# Altium PCB PCB1.PcbDoc
Units mil, origin at the board's own origin, x right, y up, seen from the top; angles counter-clockwise.
Board outline 1968.5 x 1968.5 mil, 4 copper layers (Top Layer, Layer 2, Layer 3, Bottom Layer), stack 23.756 mil thick; 70 components, 47 nets, 261 pads, 125 vias.
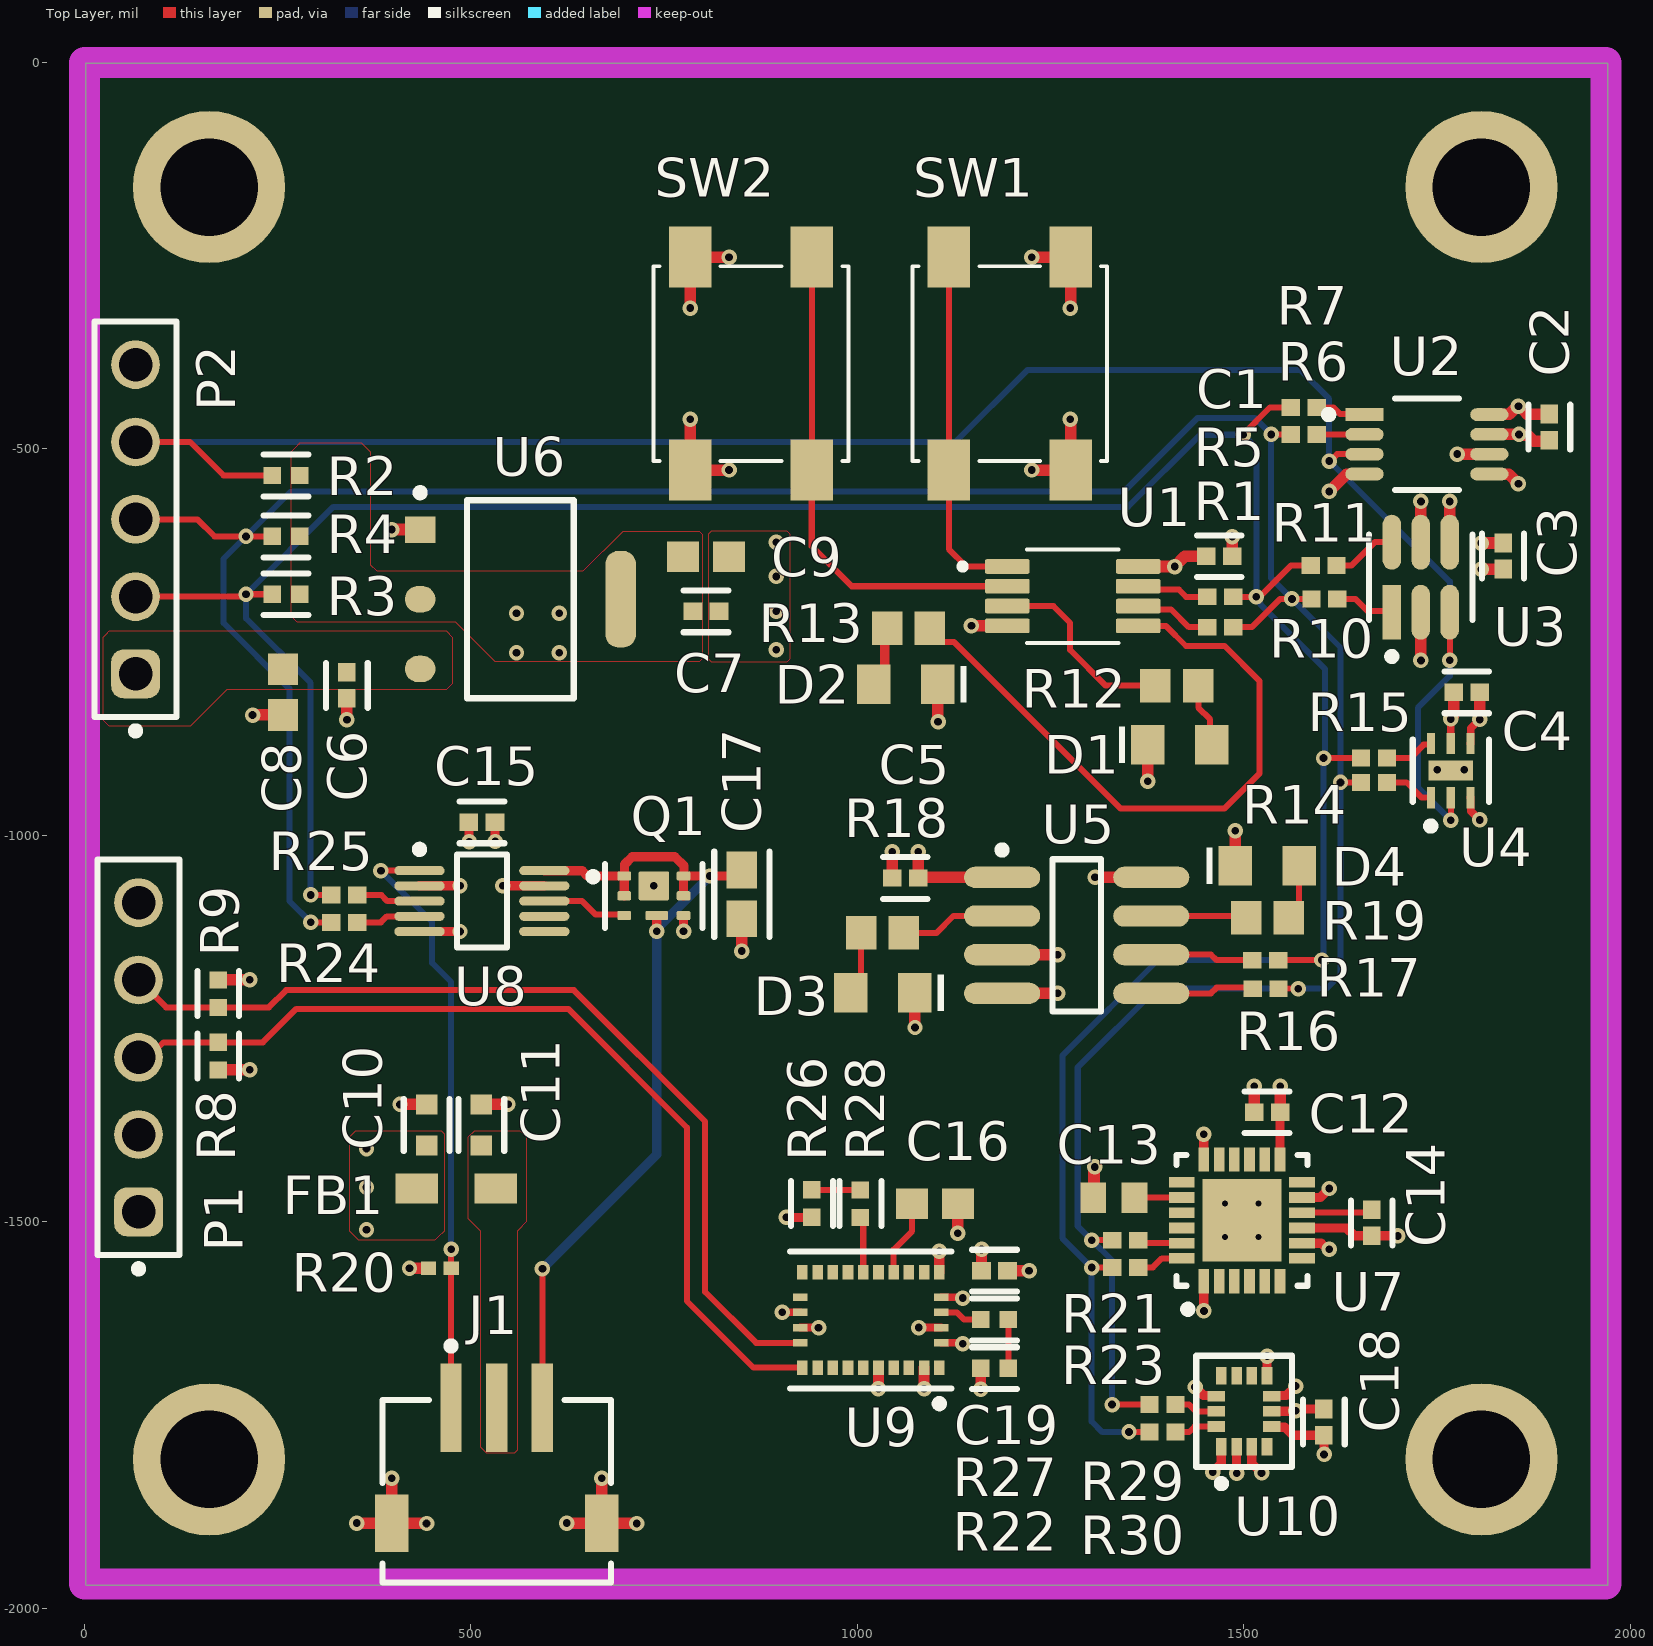
[diagram p0: Top Layer view]
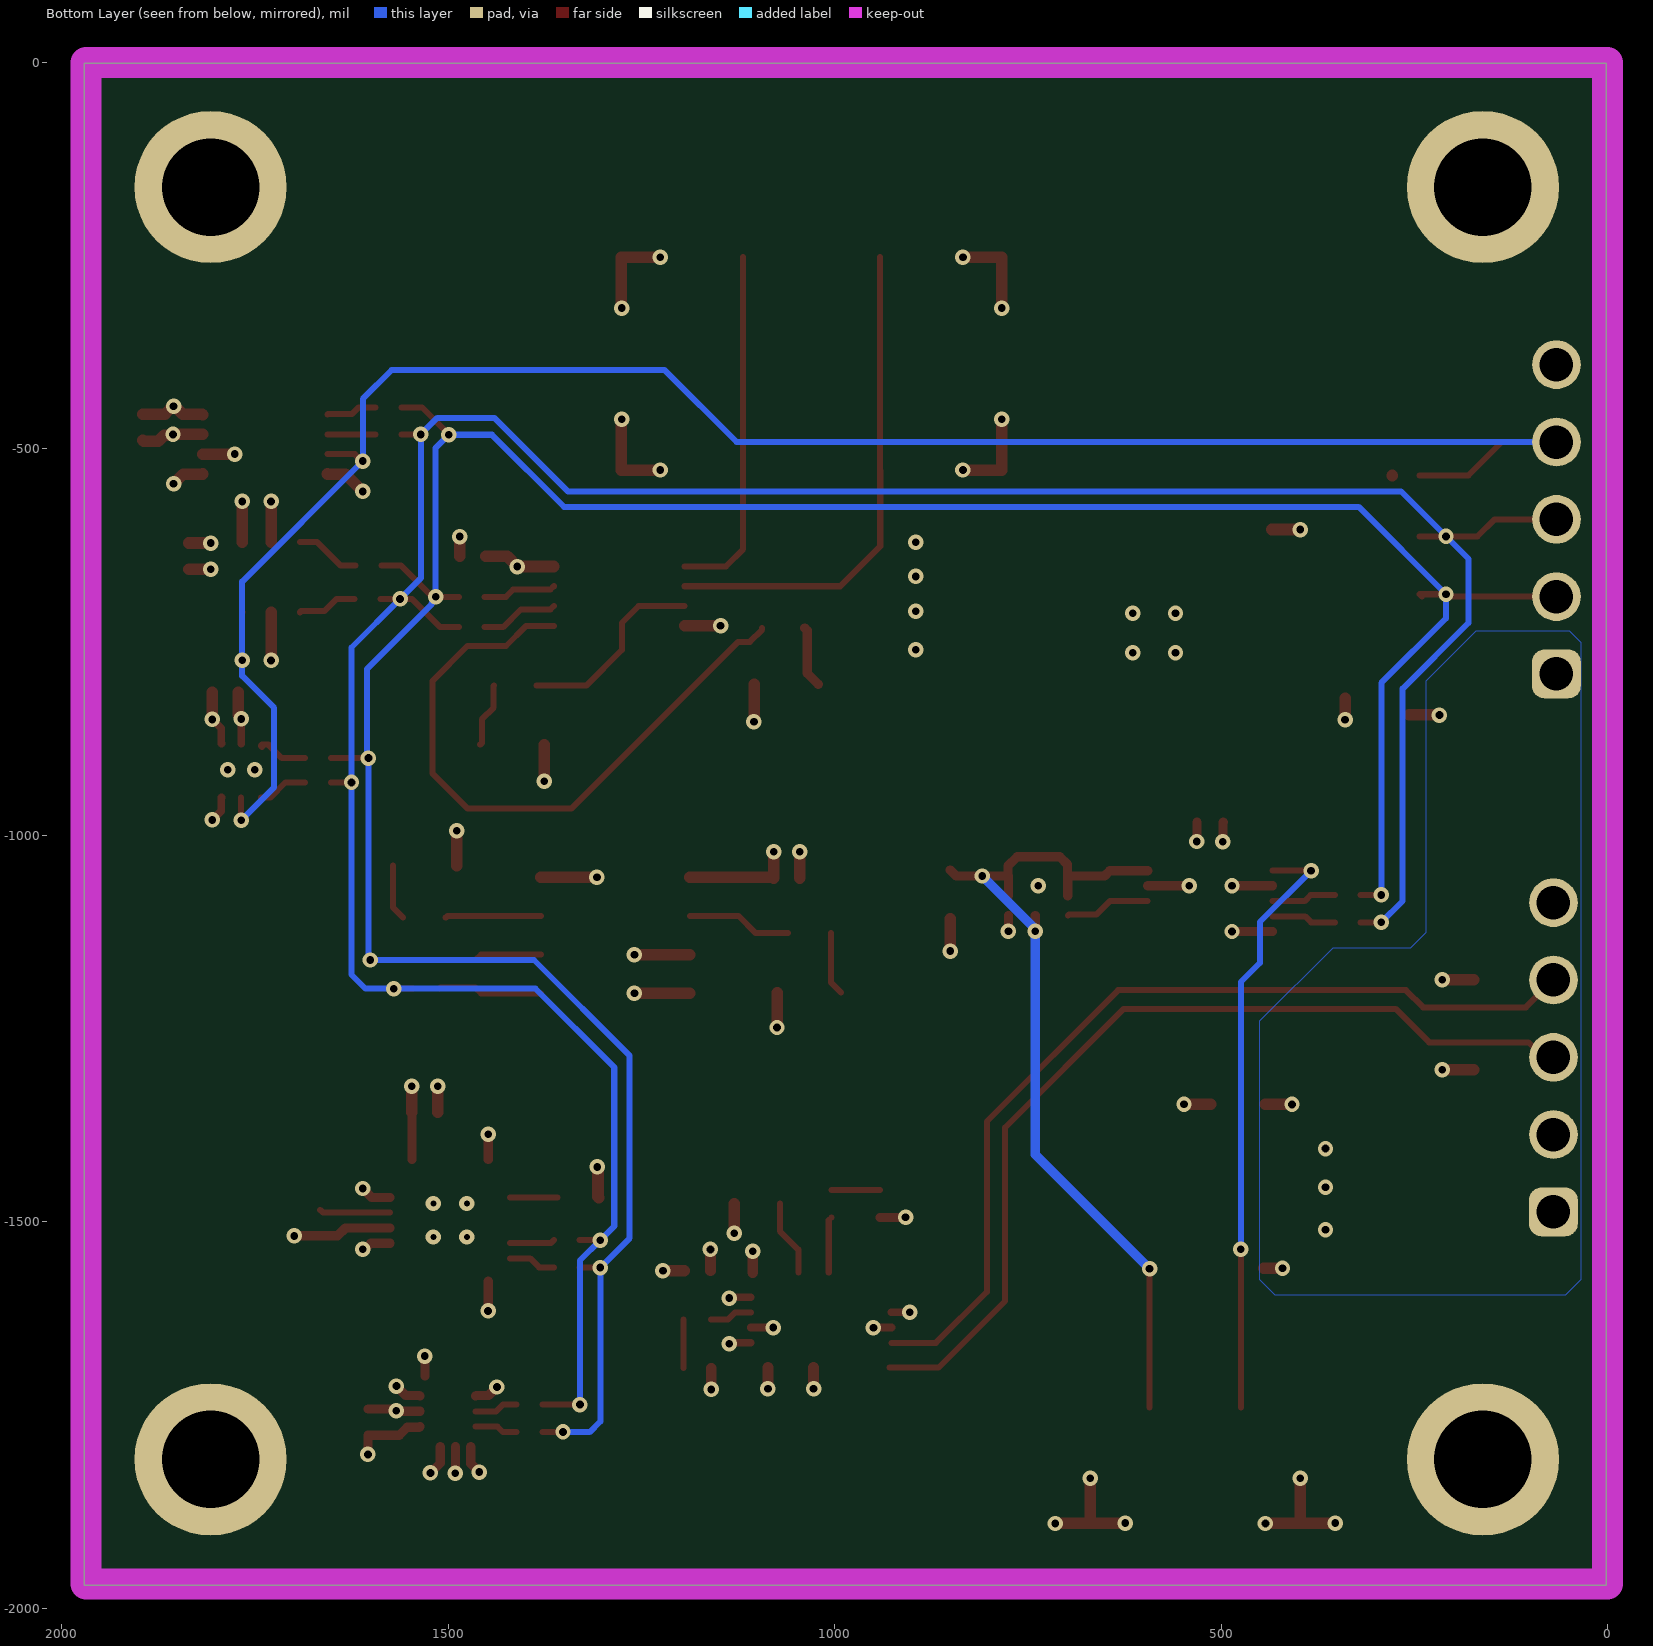
[diagram p1: Bottom Layer view, seen from below]

## Layer stack, top to bottom
Top Solder: solder mask 0.4, Solder Resist, Dk 3.5
Top Layer: signal copper 1.4
Dielectric 2: prepreg 2.8, PP-006, Dk 4.1
Layer 2: signal copper 1.378
Dielectric 1: dielectric 12.6, FR-4, Dk 4.8
Layer 3: signal copper 1.378
Dielectric 3: prepreg 2.8, PP-006, Dk 4.1
Bottom Layer: signal copper 1.4
Bottom Solder: solder mask 0.4, Solder Resist, Dk 3.5

## Board outline
1.97,-1969.61 1970.47,-1969.61 1970.47,-1.1 1.97,-1.1

## Design rules (kind name [scope] priority, off if disabled: settings)
AssemblyTestPointUsage [All] p0: scope1count=1 scope1_0_kind=Board scope1_0_value=Board scope2count=1 scope2_0_kind=Board scope2_0_value=Board commentlength=0
AssemblyTestpoint [All] p0: scope1count=1 scope1_0_kind=Board scope1_0_value=Board scope2count=1 scope2_0_kind=Board scope2_0_value=Board commentlength=0
Clearance [All] p0: scope1count=1 scope1_0_kind=Board scope1_0_value=Board scope2count=1 scope2_0_kind=Board scope2_0_value=Board commentlength=0 gap=8
Clearance [All] p1: gap=8 ignorepadtopadclearanceinfootprint=FALSE except(5: Arc-Arc Arc-Track Arc-SMDPad Track-Track Track-SMDPad SMDPad-SMDPad; 6: Arc-Via Track-Via)
ComponentClearance [All] p0: scope1count=1 scope1_0_kind=Board scope1_0_value=Board scope2count=1 scope2_0_kind=Board scope2_0_value=Board commentlength=0 gap=10 collisioncheckmode=3
DiffPairsRouting [All] p0: scope1count=1 scope1_0_kind=Board scope1_0_value=Board scope2count=1 scope2_0_kind=Board scope2_0_value=Board commentlength=0
FabricationTestPointUsage [All] p0: scope1count=1 scope1_0_kind=Board scope1_0_value=Board scope2count=1 scope2_0_kind=Board scope2_0_value=Board commentlength=0 valid=0 allowmultiple=FALSE
FabricationTestpoint [All] p0: scope1count=1 scope1_0_kind=Board scope1_0_value=Board scope2count=1 scope2_0_kind=Board scope2_0_value=Board commentlength=0 side=3 testpointundercomponent=TRUE minsize=40 maxsize=100 preferedsize=60 minholesize=0 maxholesize=40 preferedholesize=32 testpointgrid=1
FanoutControl Fanout_BGA [All] p0 off: scope1count=1 scope1_0_kind=Board scope1_0_value=Board scope2count=1 scope2_0_kind=Board scope2_0_value=Board commentlength=69 // Protel DXP Scope 1 Expression Was: IsBGA   Fanout_BGA (Default Rule)
FanoutControl Fanout_LCC [All] p0 off: scope1count=1 scope1_0_kind=Board scope1_0_value=Board scope2count=1 scope2_0_kind=Board scope2_0_value=Board commentlength=69 // Protel DXP Scope 1 Expression Was: IsLCC   Fanout_LCC (Default Rule)
FanoutControl Fanout_SOIC [All] p0 off: scope1count=1 scope1_0_kind=Board scope1_0_value=Board scope2count=1 scope2_0_kind=Board scope2_0_value=Board commentlength=71 // Protel DXP Scope 1 Expression Was: IsSOIC   Fanout_SOIC (Default Rule)
FanoutControl Fanout_Small [All] p0 off: scope1count=1 scope1_0_kind=Board scope1_0_value=Board scope2count=1 scope2_0_kind=Board scope2_0_value=Board commentlength=84 // Protel DXP Scope 1 Expression Was: (CompPinCount < 5)   Fanout_Small (Default Rule)
FanoutControl Fanout_Default [All] p0: scope1count=1 scope1_0_kind=Board scope1_0_value=Board scope2count=1 scope2_0_kind=Board scope2_0_value=Board commentlength=30 // Fanout_Default (Default Rule)
Height [All] p0: scope1count=1 scope1_0_kind=Board scope1_0_value=Board scope2count=1 scope2_0_kind=Board scope2_0_value=Board commentlength=0
HoleSize [All] p0: scope1count=1 scope1_0_kind=Board scope1_0_value=Board scope2count=1 scope2_0_kind=Board scope2_0_value=Board commentlength=0 absolutevalues=TRUE maxlimit=100 minlimit=1 maxpercent=80.000 minpercent=20.000
HoleToHoleClearance [All] p0: scope1count=1 scope1_0_kind=Board scope1_0_value=Board scope2count=1 scope2_0_kind=Board scope2_0_value=Board commentlength=0
LayerPairs [All] p0: scope1count=1 scope1_0_kind=Board scope1_0_value=Board scope2count=1 scope2_0_kind=Board scope2_0_value=Board commentlength=0 enforce=TRUE
MinimumSolderMaskSliver [All] p0: scope1count=1 scope1_0_kind=Board scope1_0_value=Board scope2count=1 scope2_0_kind=Board scope2_0_value=Board commentlength=0
NetAntennae [All] p0: scope1count=1 scope1_0_kind=Board scope1_0_value=Board scope2count=1 scope2_0_kind=Board scope2_0_value=Board commentlength=0
PasteMaskExpansion [All] p0: scope1count=1 scope1_0_kind=Board scope1_0_value=Board scope2count=1 scope2_0_kind=Board scope2_0_value=Board commentlength=0 expansion=0
PlaneClearance [All] p0: scope1count=1 scope1_0_kind=Board scope1_0_value=Board scope2count=1 scope2_0_kind=Board scope2_0_value=Board commentlength=0 clearance=20
PlaneConnect [All] p0: scope1count=1 scope1_0_kind=Board scope1_0_value=Board scope2count=1 scope2_0_kind=Board scope2_0_value=Board commentlength=0 planeconnectstyle=Relief reliefexpansion=20 reliefentries=4 reliefconductorwidth=10 reliefairgap=10
PolygonConnect [All] p0: scope1count=1 scope1_0_kind=Board scope1_0_value=Board scope2count=1 scope2_0_kind=Board scope2_0_value=Board commentlength=0 connectstyle=Direct reliefconductorwidth=10 reliefentries=4 polygonreliefangle="90 Angle"
PolygonConnect [All] p1: connectstyle=Direct reliefconductorwidth=10 reliefentries=4 polygonreliefangle="90 Angle" airgapwidth=10
RoutingCorners [All] p0: scope1count=1 scope1_0_kind=Board scope1_0_value=Board scope2count=1 scope2_0_kind=Board scope2_0_value=Board commentlength=0 cornerstyle=45-Degree minsetback=100 maxsetback=100
RoutingLayers [All] p0: scope1count=1 scope1_0_kind=Board scope1_0_value=Board scope2count=1 scope2_0_kind=Board scope2_0_value=Board commentlength=0 top layer=Automatic mid layer 1=Automatic mid layer 2=Automatic bottom layer=Automatic
RoutingPriority [All] p0: scope1count=1 scope1_0_kind=Board scope1_0_value=Board scope2count=1 scope2_0_kind=Board scope2_0_value=Board commentlength=0
RoutingTopology [All] p0: scope1count=1 scope1_0_kind=Board scope1_0_value=Board scope2count=1 scope2_0_kind=Board scope2_0_value=Board commentlength=0 topology=Shortest
RoutingVias [All] p0: scope1count=1 scope1_0_kind=Board scope1_0_value=Board scope2count=1 scope2_0_kind=Board scope2_0_value=Board commentlength=0 holewidth=10 width=20 viastyle="Through Hole" minholewidth=8 minwidth=16 maxholewidth=10 maxwidth=20
RoutingVias [All] p1: holewidth=10 width=20 viastyle="Through Hole" minholewidth=8 minwidth=16 maxholewidth=10 maxwidth=20
ShortCircuit [All] p0: scope1count=1 scope1_0_kind=Board scope1_0_value=Board scope2count=1 scope2_0_kind=Board scope2_0_value=Board commentlength=0 allowed=FALSE
SilkToBoardRegionClearance [All] p0: scope1count=1 scope1_0_kind=Board scope1_0_value=Board scope2count=1 scope2_0_kind=Board scope2_0_value=Board commentlength=0
SilkToSilkClearance [All] p0: scope1count=1 scope1_0_kind=Board scope1_0_value=Board scope2count=1 scope2_0_kind=Board scope2_0_value=Board commentlength=0
SilkToSolderMaskClearance [All] p0 off: scope1count=1 scope1_0_kind=Board scope1_0_value=Board scope2count=1 scope2_0_kind=Board scope2_0_value=Board commentlength=44 // Protel DXP Scope 1 Expression Was: IsPad
SolderMaskExpansion [All] p0: scope1count=1 scope1_0_kind=Board scope1_0_value=Board scope2count=1 scope2_0_kind=Board scope2_0_value=Board commentlength=0 expansion=4
SolderMaskExpansion [All] p1: expansion=4 istentingtop=FALSE
UnRoutedNet [All] p0: scope1count=1 scope1_0_kind=Board scope1_0_value=Board scope2count=1 scope2_0_kind=Board scope2_0_value=Board commentlength=0
UnpouredPolygon [All] p0: scope1count=1 scope1_0_kind=Board scope1_0_value=Board scope2count=1 scope2_0_kind=Board scope2_0_value=Board commentlength=0
Width pow [All] p0: scope1count=1 scope1_0_kind=NetClass scope1_0_value=pow scope2count=1 scope2_0_kind=Board scope2_0_value=Board commentlength=0 maxlimit=20 minlimit=10 preferedwidth=15
Width [All] p0: scope1count=1 scope1_0_kind=NetClass scope1_0_value="All Nets" scope2count=1 scope2_0_kind=Board scope2_0_value=Board commentlength=0 maxlimit=20 minlimit=7.8 preferedwidth=10
Width pow [InNetClass('pow')] p1: maxlimit=20 minlimit=10 preferedwidth=15 midlayer1_maxwidth=10 midlayer1_prefwidth=10 midlayer2_maxwidth=10 midlayer2_prefwidth=10 minimp=50.000000 maximp=50.000000 favimp=50.000000
Width [InNetClass('All Nets')] p2: maxlimit=20 minlimit=7.8 preferedwidth=10 toplayer_prefwidth=7.8 midlayer1_minwidth=10 midlayer1_maxwidth=10 midlayer2_minwidth=10 midlayer2_maxwidth=10 bottomlayer_prefwidth=7.8 minimp=50.000000 maximp=50.000000 favimp=50.000000
30 further rules are at their usual default settings.

## Components (designator, comment, footprint, x,y, rotation, side; value= is the part's Value field where it differs from the comment)
C1 "GRM155R71H104KE14D" FP-GRM155-0_05-IPC_B 1468.06,-638.93 r0 top
C2 "GRM155R71H104KE14D" FP-GRM155-0_05-IPC_B 1895,-471.87 r270 top
C3 "GRM155R71H104KE14D" FP-GRM155-0_05-IPC_B 1835.13,-638.64 r270 top
C4 "GRM155R71H104KE14D" FP-GRM155-0_05-IPC_B 1788.13,-815 r180 top
C5 "GRM155R71H104KE14D" FP-GRM155-0_05-IPC_B 1061.87,-1055.12 r180 top
C6 "GRM155R71H104KE14D" FP-GRM155-0_05-IPC_B 339.65,-805.85 r270 top
C7 "GRM155R71H104KE14D" FP-GRM155-0_05-IPC_B 804.21,-710.24 r0 top
C8 "0603YC105JAT2A" CAPC1608X90X35NL15T15 256.97,-814.57 r90 top
C9 "0603YC105JAT2A" CAPC1608X90X35NL15T15 804.21,-639.37 r180 top
C10 "GCM188R71E105KA64D" FP-GCM188-0_1-MFG 442.75,-1374.5 r90 top
C11 "GCM188R71E105KA64D" FP-GCM188-0_1-MFG 513.61,-1374.5 r90 top
C12 "GRM155R71H104KE14D" FP-GRM155-0_05-IPC_B 1530.05,-1358.14 r180 top
C13 "VJ0603Y222KXCAC" CAPC1608X92X38NL15T08 1331.69,-1468.5 r0 top
C14 "GRM155R71H104KE14D" FP-GRM155-0_05-IPC_B 1665.35,-1501.12 r270 top
C15 "GRM155R71H104KE14D" FP-GRM155-0_05-IPC_B 514.29,-983.15 r180 top
C16 "0603YC105JAT2A" CAPC1608X90X35NL15T15 1100.39,-1476.38 r180 top
C17 "GRM188R60J106ME47D" FP-GRM188-0_1-e0_2_0_55-IPC_A 850.48,-1076.28 r270 top
C18 "GRM155R71H104KE14D" FP-GRM155-0_05-IPC_B 1603.31,-1758.88 r90 top
C19 "GRM155R71H104KE14D" FP-GRM155-0_05-IPC_B 1177.35,-1562.99 r0 top
D1 "150080VS75000" WL-SMCW_0805_150080xx75000 1416.98,-882.67 r0 top
D2 "150080VS75000" WL-SMCW_0805_150080xx75000 1062.62,-804.54 r180 top
D3 "150080VS75000" WL-SMCW_0805_150080xx75000 1032.95,-1203.33 r180 top
D4 "150080VS75000" WL-SMCW_0805_150080xx75000 1530.01,-1039.19 r0 top
FB1 "742792011" WE-CBF_0805_L2W1.2H0.9_HC 481.11,-1456.68 r0 top
J1 "S3B-ZR-SM4A-TF(LF)(SN)" FP-S3B-ZR-SM4A-TF_LF_SN-MFG 533.46,-1848.43 r180 top
P1 "61300511121" 61300511121 70.22,-1286.99 r90 top
P2 "61300511121" 61300511121 66.28,-591.14 r90 top
Q1 "CSD16301Q2" FP-CSD16301Q2-MFG 736.73,-1078.07 r0 top
R1 "RC0402JR-100RL" RESC1005X40X25NL05T10 1469.27,-730.72 r180 top
R2 "CRCW04024K70FKED" FP-CRCW0402-e3-IPC_B 260.91,-534.5 r0 top
R3 "CRCW04024K70FKED" FP-CRCW0402-e3-IPC_B 260.91,-688.04 r0 top
R4 "CRCW04024K70FKED" FP-CRCW0402-e3-IPC_B 260.91,-613.24 r0 top
R5 "RC0402JR-100RL" RESC1005X40X25NL05T10 1469.27,-691.35 r180 top
R6 "RC0402JR-100RL" RESC1005X40X25NL05T10 1577.25,-481.28 r0 top
R7 "RC0402JR-100RL" RESC1005X40X25NL05T10 1577.25,-446.41 r0 top
R8 "CRCW04024K70FKED" FP-CRCW0402-e3-IPC_B 173.23,-1285.52 r270 top
R9 "CRCW04024K70FKED" FP-CRCW0402-e3-IPC_B 173.23,-1204.72 r90 top
R10 "RC0402JR-100RL" RESC1005X40X25NL05T10 1604.1,-694.05 r0 top
R11 "RC0402JR-100RL" RESC1005X40X25NL05T10 1603.11,-650.74 r0 top
R12 "ERA3AEB4020V" RESC1608X55X30ML20T20 1413.04,-806.22 r0 top
R13 "ERA3AEB4020V" RESC1608X55X30ML20T20 1066.13,-731.85 r180 top
R14 "RC0402JR-100RL" RESC1005X40X25NL05T10 1668.27,-931.5 r180 top
R15 "RC0402JR-100RL" RESC1005X40X25NL05T10 1668.27,-900 r180 top
R16 "RC0402JR-100RL" RESC1005X40X25NL05T10 1528.03,-1198.25 r180 top
R17 "RC0402JR-100RL" RESC1005X40X25NL05T10 1527.57,-1161.42 r180 top
R18 "ERA3AEB4020V" RESC1608X55X30ML20T20 1032.49,-1125.98 r180 top
R19 "ERA3AEB4020V" RESC1608X55X30ML20T20 1530.52,-1106.3 r0 top
R20 "RC0402FR-0710KL" RESC1005X40X25LL05T10 459.85,-1559.98 r180 top
R21 "RC0402JR-100RL" RESC1005X40X25NL05T10 1346.46,-1523.62 r0 top
R22 "CRCW04024K70FKED" FP-CRCW0402-e3-IPC_B 1177.35,-1689.12 r180 top
R23 "RC0402JR-100RL" RESC1005X40X25NL05T10 1346.46,-1559.05 r0 top
R24 "RC0402JR-100RL" RESC1005X40X25NL05T10 336.14,-1112.52 r0 top
R25 "RC0402JR-100RL" RESC1005X40X25NL05T10 336.14,-1077.09 r0 top
R26 "CRCW04024K70FKED" FP-CRCW0402-e3-IPC_B 941.2,-1476.28 r270 top
R27 "CRCW04024K70FKED" FP-CRCW0402-e3-IPC_B 1177.35,-1626.13 r0 top
R28 "CRCW04024K70FKED" FP-CRCW0402-e3-IPC_B 1003.94,-1476.38 r90 top
R29 "RC0402JR-100RL" RESC1005X40X25NL05T10 1394.68,-1736.22 r0 top
R30 "RC0402JR-100RL" RESC1005X40X25NL05T10 1394.68,-1771.65 r0 top
SW1 "430481025816" 430481025816 1197.02,-389.76 r90 top
SW2 "430481025816" 430481025816 862.37,-389.76 r270 top
U1 "TCA9536DGKR" SOP65P490X110-8N 1278.54,-690.51 r0 top
U2 "TMP275AIDGKR" FP-DGK0008A-IPC_C 1736.67,-494.07 r0 top
U3 "TMP101NA/3K" FP-DBV0006A-IPC_A 1728.68,-666.05 r90 top
U4 "STTS22HTR" FP-UDFN-6L-DM00423052-MFG 1767.56,-916.06 r90 top
U5 "LTC1710IS8#TRPBF" LT-S8-8_M 1283.63,-1129.25 r0 top
U6 "AMS1117-3.3" FP-AMS1117-IPC_C 564.06,-694.49 r0 top
U7 "MPU-6050" IS-QFN-24_V 1497.36,-1497.87 r90 top
U8 "MAX6650EUB+" MAXM-U10+2_N 514.29,-1084.96 r0 top
U9 "BNO055" FP-BNO055-MFG 1017.37,-1626.77 r270 top
U10 "LSM6DSOTR" FP-LGA-14L-DM00249496-MFG 1500.31,-1744.92 r90 top

## Footprints (in the part's own frame and the unit in brackets; to place one, negate y for a bottom-side part, rotate by r counter-clockwise, add the part's x,y. Pads: shape width x height; smd on the part's side, far side on the other; paste and mask are expansions set on the pad)
61300511121 [mm] "Pin Header, pitch 2.54 mm, THT, Vertical, single row, 5p"
  rrect50% 1.6x1.6 hole 1.1: 1(-5.08,0)
  round 1.6 hole 1.1: 2(-2.54,0) 3(0,0) 4(2.54,0) 5(5.08,0)
  silkscreen extent -7.07,-1.35 6.5,1.35
430481025816 [mm] "SMD Tact Switch, body 6x6mm"
  rect 2x1.4 smd: A1(-3.5,2) A2(3.5,2) B1(-3.5,-2) B2(3.5,-2)
  silkscreen extent -3.2,-3.2 3.2,3.2
CAPC1608X90X35NL15T15 [mm] "Chip Capacitor, 2-Leads, Body 1.60x0.81mm, IPC Medium Density"
  rect 1.05x1 smd: 1(-0.75,0) 2(0.75,0)
CAPC1608X92X38NL15T08 [mm] "Chip Capacitor, 2-Leads, Body 1.60x0.80mm, IPC Medium Density"
  rect 0.85x1 smd: 1(-0.675,0) 2(0.675,0)
FP-AMS1117-IPC_C [mm]
  rect 1.004x0.872 smd paste+0 mask+0: 1(-3.295,2.29)
  rrect100% 1.004x0.872 smd paste+0 mask+0: 2(-3.295,0) 3(-3.295,-2.29)
  rrect87% 1.004x3.182 smd paste+0 mask+0: 4(3.295,0)
  silkscreen extent -3.42,-3.25 1.75,3.62
FP-BNO055-MFG [mm]
  rect 0.475x0.35 smd paste+0 mask+0: 1(1.562,2.25) 6(-1.562,2.25) 7(-1.562,1.75) 8(-1.562,1.25) 9(-1.562,0.75) 10(-1.562,0.25) 11(-1.562,-0.25) 12(-1.562,-0.75) 13(-1.562,-1.25) 14(-1.562,-1.75) 15(-1.562,-2.25) 20(1.562,-2.25) 21(1.562,-1.75) 22(1.562,-1.25) 23(1.562,-0.75) 24(1.562,-0.25) 25(1.562,0.25) 26(1.562,0.75) 27(1.562,1.25) 28(1.562,1.75)
  rect 0.25x0.475 smd paste+0 mask+0: 2(0.75,2.312) 3(0.25,2.312) 4(-0.25,2.312) 5(-0.75,2.312) 16(-0.75,-2.312) 17(-0.25,-2.312) 18(0.25,-2.312) 19(0.75,-2.312)
  silkscreen extent -2.25,-2.65 2.87,2.65
FP-CRCW0402-e3-IPC_B [mil]
  rect 22.37x22.54 smd paste+0 mask+0: 1(-17.8,0) 2(17.8,0)
  silkscreen extent -29,-27 29,27
FP-CSD16301Q2-MFG [mm]
  rrect33% 0.45x0.3 smd paste+0 mask+0: 1(-0.975,0.65) 2(-0.975,0) 3(-0.975,-0.65) 4(0.975,-0.65) 5(0.975,0) 6(0.975,0.65)
  rrect33% 0.75x0.3 smd paste-1000 mask+0: 7(0.095,-0.65)
  rrect11% 1x0.95 smd paste-1000 mask+0: 8(0,0.325)
  silkscreen extent -2.12,-1.05 1.6,1.05
FP-DBV0006A-IPC_A [mm]
  rect 1.805x0.61 smd paste+0 mask+0: 1(-1.15,0.95)
  rrect100% 1.805x0.61 smd paste+0 mask+0: 2(-1.15,0) 3(-1.15,-0.95) 4(1.15,-0.95) 5(1.15,0) 6(1.15,0.95)
  silkscreen extent -2.73,-1.7 1.4,1.7
FP-DGK0008A-IPC_C [mm]
  rect 1.257x0.418 smd paste+0 mask+0: 1(-2.051,0.975)
  rrect100% 1.257x0.418 smd paste+0 mask+0: 2(-2.051,0.325) 3(-2.051,-0.325) 4(-2.051,-0.975) 5(2.051,-0.975) 6(2.051,-0.325) 7(2.051,0.325) 8(2.051,0.975)
  silkscreen extent -3.35,-1.5 1.05,1.5
FP-GCM188-0_1-MFG [mm]
  rect 0.65x0.7 smd paste+0 mask+0: 1(-0.675,0) 2(0.675,0)
  silkscreen extent -0.85,-0.75 0.85,0.75
FP-GRM155-0_05-IPC_B [mil]
  rect 24.23x22.54 smd paste+0 mask+0: 1(-16.87,0) 2(16.87,0)
  silkscreen extent -29,-27 29,27
FP-GRM188-0_1-e0_2_0_55-IPC_A [mil]
  rect 47.57x39.85 smd paste+0 mask+0: 1(-31.57,0) 2(31.57,0)
  silkscreen extent -55,-36 55,36
FP-LGA-14L-DM00249496-MFG [mm]
  rect 0.575x0.35 smd paste+0 mask+0: 1(-1.162,0.75) 2(-1.162,0.25) 3(-1.162,-0.25) 4(-1.162,-0.75) 8(1.162,-0.75) 9(1.162,-0.25) 10(1.162,0.25) 11(1.162,0.75)
  rect 0.35x0.575 smd paste+0 mask+0: 5(-0.5,-0.913) 6(0,-0.913) 7(0.5,-0.913) 12(0.5,0.913) 13(0,0.913) 14(-0.5,0.913)
  silkscreen extent -2.5,-1.58 1.83,1.58
FP-S3B-ZR-SM4A-TF_LF_SN-MFG [mm]
  rect 0.7x2.9 smd paste+0 mask+0: 1(1.5,-2.75) 2(0,-2.75) 3(-1.5,-2.75)
  rect 1.1x1.9 smd paste+0 mask+0: 4(-3.45,1.05) 5(3.45,1.05)
  silkscreen extent -3.75,-4.9 3.75,3
FP-UDFN-6L-DM00423052-MFG [mm]
  rect 0.7x0.27 smd paste+0 mask+0: 1(-0.89,0.65) 2(-0.89,0) 3(-0.89,-0.65) 4(0.89,-0.65) 5(0.89,0) 6(0.89,0.65)
  rect 0.65x1.45 smd paste+0 mask+0: 7(0,0)
  silkscreen extent -1.95,-1.25 1.02,1.25
IS-QFN-24_V [mm] "QFN, 24-Leads, Body 4x4mm, Pitch 0.5mm, Thermal Pad 2.7x2.6mm"
  rect 0.8x0.35 smd: 1(-2,1.25) 2(-2,0.75) 3(-2,0.25) 4(-2,-0.25) 5(-2,-0.75) 6(-2,-1.25) 13(2,-1.25) 14(2,-0.75) 15(2,-0.25) 16(2,0.25) 17(2,0.75) 18(2,1.25)
  rect 0.35x0.85 smd mask+0: 7(-1.25,-1.975) 8(-0.75,-1.975) 9(-0.25,-1.975) 10(0.25,-1.975) 11(0.75,-1.975) 12(1.25,-1.975) 19(1.25,1.975) 20(0.75,1.975) 21(0.25,1.975) 22(-0.25,1.975) 23(-0.75,1.975) 24(-1.25,1.975)
  rect 2.7x2.6 smd: 25(0,0)
  silkscreen extent -3.05,-2.15 2.15,2.15
LT-S8-8_M [mm] "SOIC, 8-Leads, Body 5x4mm, Pitch 1.27mm, IPC Low Density"
  oval 2.5x0.7 smd: 1(-2.45,1.905) 2(-2.45,0.635) 3(-2.45,-0.635) 4(-2.45,-1.905) 5(2.45,-1.905) 6(2.45,-0.635) 7(2.45,0.635) 8(2.45,1.905)
  silkscreen extent -2.57,-2.5 0.8,2.93
MAXM-U10+2_N [mm] "SOP, 10-Leads, Body 3x3mm, Pitch 0.5mm, IPC Medium Density"
  oval 1.65x0.3 smd: 1(-2.05,1) 2(-2.05,0.5) 3(-2.05,0) 4(-2.05,-0.5) 5(-2.05,-1) 6(2.05,-1) 7(2.05,-0.5) 8(2.05,0) 9(2.05,0.5) 10(2.05,1)
  silkscreen extent -2.17,-1.52 0.82,1.82
RESC1005X40X25LL05T10 [mm] "Chip Resistor, 2-Leads, Body 1.00x0.50mm, IPC High Density"
  rect 0.5x0.45 smd: 1(-0.375,0) 2(0.375,0)
RESC1005X40X25NL05T10 [mm] "Chip Resistor, 2-Leads, Body 1.00x0.50mm, IPC Medium Density"
  rect 0.6x0.55 smd: 1(-0.425,0) 2(0.425,0)
RESC1608X55X30ML20T20 [mm] "Chip Resistor, 2-Leads, Body 1.60x0.80mm, IPC Low Density"
  rect 1x1.1 smd: 1(-0.7,0) 2(0.7,0)
SOP65P490X110-8N [mm]
  rrect25% 1.47x0.48 smd mask+0: 1(-2.15,0.975) 2(-2.15,0.325) 3(-2.15,-0.325) 4(-2.15,-0.975) 5(2.15,-0.975) 6(2.15,-0.325) 7(2.15,0.325) 8(2.15,0.975)
  silkscreen extent -3.72,-1.54 1.5,1.54
WE-CBF_0805_L2W1.2H0.9_HC [mm] "SMD EMI Suppression Ferrite  Bead, body 2.00x1.20mm"
  rect 1.4x1 smd: 1(-1.3,0) 2(1.3,0)
WL-SMCW_0805_150080xx75000 [mm] "SMD Mono-color Chip LED, body 2.0x1.25mm"
  rect 1.1x1.3 smd: 1(-1.05,0) 2(1.05,0)
  silkscreen extent -2,-0.6 -1.8,0.6

## Part data
C1 C2 C3 C4 C5 C6 C7 C12 C14 C15 C18 C19: library part CMP-2008-04639-2, "Chip Multilayer Ceramic Capacitors for General Purpose, 0402, 0.10uF, X7R, 15%, 10%, 50V"
C8 C9 C16: library part CMP-1035-02736-2
C10 C11: library part CMP-2006-02363-4
C13: library part CMP-2006-01127-1
C17: library part CMP-2006-02792-2, "Chip Multilayer Ceramic Capacitors for General Purpose, 0603, 10uF, X5R, 15%, 20%, 6.3V"
D1 D2 D3 D4: library part CMP-1426-00009-6, "WL-SMCW SMT Mono-Color Chip LED Waterclear"
FB1: library part CMP-0220-00043-2
J1: library part CMP-17439-000744-1, "CONN HEADER SMD R/A 3POS 1.5MM"
P1 P2: library part CMP-1502-01068-4, "THT Vertical Pin Header WR-PHD, Pitch 2.54 mm, Single Row, 5 pins"
Q1: library part CMP-04962-000001-1, "MOSFET N-CH 25V 6-SON"
R1 R5 R6 R7 R10 R11 R14 R15 R16 R17 R21 R23 R24 R25 R29 R30: library part CMP-2002-06970-1
R2 R3 R4 R8 R9 R22 R26 R27 R28: library part CMP-2002-00051-3, "RES Thick Film, 4.7kO, 1%, 0.063W, 100ppm/°C, 0402"
R12 R13 R18 R19: library part CMP-2000-00056-1
R20: library part CMP-2002-07353-1
SW1 SW2: library part CMP-1452-00025-9, "Switch Tactile Spst-no 0.05A 12V"
U1: "Remote 4-Bit I²C and SMBus I/O expander with configuration register and interrupt"
U2: library part CMP-04948-000056-1, "SENSOR DIGITAL -40C-125C 8VSSOP"
U3: library part CMP-04948-000039-1, "SENSOR DIGITAL -55C-125C SOT23-6"
U4: library part CMP-12184-000002-1, "LOW-VOLTAGE, ULTRA-LOW-POWER, 0."
U5: library part CMP-0479-00585-1, "Control Up to 6 Peripherals on Same Bus, 2.7 to 5.5 V Vin, 8-pin SOIC (S8-8), -40 to 85 degC, Pb-Free, Tape and Reel"
U6: library part CMP-209535-000001-1, "LDO Voltage Regulators 1A, 3.3V"
U7: library part CMP-1753-00002-2, "3-Axis Gyroscope, Accelerometer and a Digital Motion Processor(TM) (DMP), 2.375 to 3.46 V, -40 to 85 degC, 24-Pin QFN, RoHS, Tape and Reel"
U8: library part CMP-0253-00590-1, "Fan-Speed Regulator and Monitor with I2C / SMBus Interface, -40 to 85 degC, 10-Pin SOP (U10+2), Pb-Free"
U9: library part CMP-2000-05075-4, "IMU ACCEL/GYRO/MAG I2C 28LGA"
U10: library part CMP-12177-000012-1, "CONSUMER MEMS"

## Free pads (board coordinates)
  round 196.85 hole 125.98: ""(161.42,-1807.09) ""(161.42,-161.42) ""(1807.09,-1807.09) ""(1807.09,-161.42)

## Via types
v1: diameter 20, hole 10, Top Layer to Bottom Layer, tented both sides, 121 vias
v2: diameter 19.68, hole 7.87, Top Layer to Bottom Layer, 4 vias

## Nets (pads, with @x,y where several pads share a name; then routed paths per layer and width w, separated by ;. In a path a pad name is that pad's centre, name@x,y a point inside that pad or via, vN(x,y) a via of type N, cw(c..) or ccw(c..) an arc to the next point about the centre after c; other vN are vias at no path point)
3V3_SYS: C1.1 C2.1 C3.1 C4.1 C5.1 C7.1 C9.2 C12.1 C15.1 C18.1 C19.1 P1.2 R2.2 R3.2 R4.2 R8.2 R9.2 R22.2 R26.2 U1.8 U2.8 U3.4 U3.5 U4.3 U4.4 U5.1 U5.8 U6.2 U6.4 U7.8 U7.13 U8.9 U9.3 U9.6 U9.28 U10.5 U10.8 U10.12 | length 1253.6
  Top Layer w10: v1(1079.23,-1636.65) v1(1079.23,-1636.65) U9.3 ; U4.3 1793.46,-951.41 1793.46,-968.46 v1(1805,-980) ; U4.4 1793.46,-880.7 1793.46,-861.54 v1(1805,-850)
  Top Layer w12: C15.1 531.16,-1007.6 v1(531.45,-1007.89) ; v1(541.16,-1065.17) 541.26,-1065.28 U8.9 ; v1(908.23,-1494.01) 908.3,-1494.08 R26.2 ; v1(1436.72,-1713.48) 1436.88,-1713.48 1447.75,-1724.35 1463.5,-1724.35 U10.12 ; U10.8 1529.84,-1673.65 v1(1529.99,-1673.5) ; U10.5 1537.13,-1765.5 1552.9,-1765.5 1563.15,-1775.75 C18.1 1603.45,-1775.89 1603.45,-1800.54 v1(1603.59,-1800.68) ; U7.13 1546.57,-1358.49 C12.1 ; v1@1546.93,-1324.55 v1(1547.05,-1324.43) ; U7.8 1600.04,-1527.4 1608.07,-1535.43 v1(1610.24,-1535.43)
  Top Layer w14: v1(1086.21,-1715.74) 1086.27,-1715.68 U9.28 ; U9.6 v1(1106.02,-1537.79) v1(1106.02,-1537.79) ; v1(1159.49,-1716.58) 1159.55,-1716.52 R22.2 ; C19.1 1160.48,-1535.59 v1(1160.54,-1535.53)
  Top Layer w15: R8.2 213.84,-1303.32 v1(214.03,-1303.12) ; R9.2 213.84,-1186.92 v1(214.03,-1186.73) ; R2.2 R2.2@278.76,-534.55 ; v1@1078.74,-1021.16 C5.1 1079.61,-1054.25 U5.1 ; v1(1307.36,-1054.17) 1307.44,-1054.25 U5.8 ; U1.8 1410.4,-652.13 1423.6,-638.93 C1.1 ; C12.1 v1@1546.93,-1324.55 ; U3.5 1728.68,-568.11 v1(1728.85,-567.95) ; U3.4 1766.08,-568.11 v1(1766.25,-567.95) ; v1(1805,-850) C4.1 ; v1(1806.9,-621.86) 1806.95,-621.81 1835.08,-621.81 C3.1 ; U2.8 1817.69,-455.41 1843.26,-455.41 v1@1853.67,-445 ; v1(1855,-445) 1856.1,-445 1866.1,-455 C2.1
  other v1: 1078.74,-1021.15 559.06,-763.78 614.17,-763.78 559.06,-712.6 614.17,-712.6 1410.54,-652.26
5V: C6.1 C8.2 C10.1 FB1.1 P1.1 P2.1 R20.2 U6.3 | length 24.6
  Top Layer w15: v1(420.63,-1559.76) 420.74,-1559.87 444.98,-1559.87 R20.2
  other v1: 365,-1510 365,-1455 365,-1405
5V_M: C11.1 FB1.2 J1.2
\A\L\E\R\T\: U8.7
\F\U\L\L\_\O\N: U8.6
GND: C1.2 C2.2 C3.2 C4.2 C5.2 C6.2 C7.2 C8.1 C9.1 C10.2 C11.2 C12.2 C13.1 C14.2 C15.2 C16.1 C17.2 C18.2 C19.2 D1.1 D2.1 D3.1 D4.1 J1.4 J1.5 P1.5 P2.5 Q1.4 Q1.8 SW1.B1 SW1.B2 SW2.B1 SW2.B2 U1.4 U2.4 U2.5 U2.6 U2.7 U3.2 U4.5 U4.7 U5.3 U5.4 U6.1 U7.1 U7.9 U7.11 U7.18 U8.2 U8.5 U9.2 U9.5 U9.17 U9.18 U9.25 U10.1 U10.2 U10.3 U10.6 U10.7 | length 2668.9
  Top Layer w10: v1(902.87,-1616.86) 902.93,-1616.92 U9.17 ; U9.18 949.73,-1636.61 v1(949.79,-1636.67) ; U9.2 1135.16,-1656.29 v1(1136.31,-1657.45) ; U9.5 1135.16,-1597.24 v1(1136.31,-1598.4) ; v1(1767.5,-849.34) 1767.56,-849.4 U4.5
  Top Layer w12: U8.5 485.91,-1124.33 v1(485.95,-1124.3) ; U8.2 485.91,-1065.28 v1(485.95,-1065.24) ; C15.2 497.7,-983.44 497.7,-1007.89 v1(498,-1008.18) ; v1(775.14,-1123.95) Q1.4 ; C17.2@850.39,-1107.94 C17.2 ; v1(1448.08,-1386.5) 1448.15,-1386.57 U7.18 ; v1@1448.15,-1615.05 U7.1 ; v1(1459.64,-1823.49) 1470.79,-1812.34 U10.1 ; U10.2 1490.47,-1824.76 v1(1490.67,-1824.96) ; U10.3 1510.16,-1811.92 v1(1522.82,-1824.58) ; v1@1513.18,-1324.55 v1(1513.3,-1324.43) ; U10.6 1566.1,-1744.92 v1(1566.93,-1744.09) 1569.09,-1744.09 1571.18,-1742.01 C18.2 ; U10.7 1537.13,-1724.35 1554.77,-1724.35 v1(1566.8,-1712.32) ; U7.9 1632.58,-1507.72 1642.86,-1518 C14.2 1698.94,-1518 v1(1699.06,-1518.12) ; U7.11 1598.58,-1468.35 v1(1610.24,-1456.69)
  Top Layer w14: v1(1027.15,-1715.74) v1(1027.15,-1715.74) U9.25
  Top Layer w15: v1(217.59,-844.33) 217.82,-844.1 C8.1 ; v1(339.65,-850.39) C6.2 ; v1(352.53,-1889.48) 352.81,-1889.76 J1.5 ; v1(397.64,-1831.48) J1.5 ; v1(397.76,-604.38) U6.1@434.31,-604.36 ; v1(408.32,-1348.01) 408.41,-1347.92 C10.2 ; v1(442.75,-1890.05) 442.46,-1889.76 J1.5 ; C11.2 547.96,-1347.92 v1(548.05,-1347.83) ; v1(624.18,-1889.48) 624.47,-1889.76 J1.4 ; v1(669.29,-1831.48) J1.4 ; v1(714.4,-1890.05) 714.12,-1889.76 J1.4 ; v1(783.94,-461.66) 783.63,-461.97 SW2.B2 833.73,-527.56 v1(833.93,-527.36) ; v1(783.94,-317.87) 783.63,-317.56 SW2.B1 833.73,-251.97 v1(833.93,-252.17) ; v1(850.39,-1149.61) C17.2@850.39,-1107.94 ; C5.2 v1@1045,-1021.16 ; D3.1 1074.29,-1248.28 v1(1074.47,-1248.47) ; D2.1 1103.96,-852.83 v1(1104.26,-853.14) ; v1(1129.85,-1514.67) 1129.92,-1514.6 C16.1 ; v1(1147.52,-728.95) v1(1147.52,-728.95) U1.4 ; U5.4 1258.8,-1204.25 v1(1258.86,-1204.31) ; U5.3 1258.8,-1154.25 v1(1258.86,-1154.31) ; C19.2 1194.32,-1563.09 1221.92,-1563.09 v1(1222.02,-1563.18) ; v1(1225.46,-527.36) 1225.66,-527.56 SW1.B1 1275.76,-461.97 v1(1275.45,-461.66) ; v1(1225.46,-252.17) 1225.66,-251.97 SW1.B2 1275.76,-317.56 v1(1275.45,-317.87) ; C13.1 1306.01,-1467.61 1306.01,-1429.72 v1(1306.9,-1428.83) ; v1(1375.62,-929.93) D1.1 ; C1.2 v1(1484.92,-613.43) ; D4.1 v1(1488.68,-993.97) ; C12.2 v1@1513.18,-1324.55 ; v1(1610.24,-555.12) 1632.62,-532.74 1655.65,-532.74 U2.4 ; U3.2 1728.68,-773.39 v1(1728.91,-773.61) ; v1(1767.5,-849.34) 1767.5,-847.99 1771.25,-844.23 C4.2 ; v1(1775.88,-506.77) 1775.98,-506.87 U2.6 ; v1(1806.9,-655.6) 1806.95,-655.56 C3.2@1835.08,-655.56 ; U2.5 1817.69,-532.74 1842.74,-532.74 v1(1855,-545) ; U2.7 1855.72,-481.28 v1(1855.78,-481.33) 1856.73,-482.29 1867.29,-482.29 1875,-490 1893.75,-490 C2.2
  other v1: 1448.16,-1615.06 736.73,-1065.28 1044.99,-1021.15 1750,-915 1785,-915 895,-760 895,-710 895,-665 895,-620.9
NetC13_2: C13.2 U7.20 | length 61.4
  Top Layer w7.8: C13.2 1358.43,-1468.35 U7.20
NetC14_1: C14.1 U7.10 | length 91.8
  Top Layer w7.8: U7.10 1661.57,-1488.03 C14.1
NetC16_2: C16.2 U9.9 | length 98.8
  Top Layer w7.8: U9.9 1046.9,-1535.78 1070.87,-1511.81 C16.2
NetC17_1: C17.1 J1.3 Q1.1 Q1.2 Q1.5 Q1.6 Q1.7 U8.10 | length 1139.4
  Top Layer w7.8: J1.3 v1@592.52,-1560.6
  Top Layer w12: v1@592.52,-1560.6 v1(592.63,-1560.49) ; U8.10 644.02,-1045.59 650.91,-1052.48 Q1.1 ; Q1.2 Q1.1 ; v1(740.49,-1123.95) Q1.7 ; Q1.5 Q1.6 Q1.6@775.5,-1052.48 ; C17.1 842.71,-1052.48 v1(809.1,-1052.48) Q1.6@775.5,-1052.48 ; Q1.1 698.55,-1052.48 698.65,-1052.39 698.65,-1037.57 708.66,-1027.56 763.78,-1027.56 775.59,-1039.37 775.59,-1052.39 Q1.6@775.5,-1052.48
  Bottom Layer w12: v1(592.63,-1560.49) 740.49,-1412.63 v1(740.49,-1123.95) ; v1@744.49,-1117.1 v1(809.1,-1052.48)
NetD1_2: D1.2 R12.2 | length 83.8
  Top Layer w7.8: R12.2 1440.94,-806.57 1440.94,-834.65 1456.25,-849.95 1456.25,-880.6 D1.2
NetD2_2: D2.2 R13.2 | length 79.8
  Top Layer w12: D2.2 1035.43,-790.38 1035.43,-734.98 R13.2
NetD3_2: D3.2 R18.2 | length 82.9
  Top Layer w7.8: D3.2 1004.93,-1190.01 R18.2
NetD4_2: D4.2 R19.2 | length 72.6
  Top Layer w7.8: R19.2 1571.35,-1093.03 D4.2
NetJ1_1: J1.1 R20.1 U8.1 | length 782.1
  Top Layer w7.8: v1(383.7,-1045.71) 383.81,-1045.59 U8.1 ; J1.1 474.41,-1535.29 v1(474.56,-1535.14)
  Bottom Layer w7.8: v1(383.7,-1045.71) 450,-1112.01 450,-1165 474.56,-1189.56 v1(474.56,-1535.14)
NetQ1_3: Q1.3 U8.8 | length 111.1
  Top Layer w7.8: U8.8 644.02,-1084.96 661.42,-1102.36 697.05,-1102.36 Q1.3
NetR1_2: R1.2 U1.6 | length 100.7
  Top Layer w7.8: U1.6 1367.43,-707.55 1405.62,-707.55 1428.78,-730.72 R1.2
NetR5_2: R5.2 U1.7 | length 95
  Top Layer w7.8: U1.7 1367.43,-681.96 1415.66,-681.96 1425.04,-691.35 R5.2
NetR6_2: R6.2 U2.2 | length 61.9
  Top Layer w7.8: R6.2 U2.2
NetR7_2: R7.2 U2.1 | length 65.8
  Top Layer w7.8: R7.2 1615.7,-446.41 1624.06,-454.77 1655.01,-454.77 U2.1
NetR10_2: R10.2 U3.1 | length 77.6
  Top Layer w7.8: R10.2 1644.05,-694.05 1660,-710 1689.94,-710 U3.1
NetR11_2: R11.2 U3.6 | length 83.9
  Top Layer w7.8: R11.2 1639.26,-650.74 1669.24,-620.76 U3.6
NetR14_1: R14.1 U4.1 | length 65.1
  Top Layer w7.8: R14.1 1710.28,-931.5 1729.52,-950.73 1741.61,-950.73 U4.1
NetR15_1: R15.1 U4.6 | length 67
  Top Layer w7.8: R15.1 1715,-900 1732.5,-882.5 1740.55,-882.5 1741.97,-883.92 1741.97,-884.06 U4.6@1740.55,-885.48
NetR16_2: R16.2 U5.5 | length 134.8
  Top Layer w7.8: U5.5 1457.17,-1204.25 1464.57,-1196.85 1509.9,-1196.85 R16.2
NetR17_2: R17.2 U5.6 | length 133.7
  Top Layer w7.8: U5.6 1457.4,-1154.25 1464.57,-1161.42 R17.2
NetR21_2: R21.2 U7.23 | length 58
  Top Layer w7.8: R21.2 1366.97,-1527.4 U7.23
NetR22_1: R22.1 R27.2 | length 63
  Top Layer w7.8: R22.1 R27.2
NetR23_2: R23.2 U7.24 | length 61.4
  Top Layer w7.8: R23.2 1363.43,-1558.81 1382.13,-1558.81 1393.86,-1547.09 U7.24
NetR24_2: R24.2 U8.4 | length 84
  Top Layer w7.8: R24.2 383.54,-1112.52 391.42,-1104.65 U8.4
NetR25_2: R25.2 U8.3 | length 84
  Top Layer w7.8: R25.2 384.17,-1077.09 392.05,-1084.96 U8.3
NetR26_1: R26.1 R28.2 | length 62.8
  Top Layer w7.8: R26.1 1003.84,-1458.48 R28.2
NetR27_1: R27.1 U9.4 | length 54.9
  Top Layer w7.8: U9.4 1128.73,-1616.92 1137.8,-1625.98 1159.41,-1625.98 R27.1
NetR28_1: R28.1 U9.11 | length 72.6
  Top Layer w7.8: R28.1 1007.53,-1497.77 U9.11
NetR29_2: R29.2 U10.13 | length 56.6
  Top Layer w7.8: R29.2 1429.13,-1736.22 1437.83,-1744.92 U10.13
NetR30_2: R30.2 U10.14 | length 55.9
  Top Layer w7.8: R30.2 1429.13,-1771.65 1436.18,-1764.61 U10.14
O\V\E\R\T\E\M\P\_\A\L\E\R\T\: P2.4 R2.1 U2.3 U3.3 U4.2 | length 2578.3
  Top Layer w7.8: P2.4 136.81,-491.14 180.17,-534.5 R2.1 ; v1(1610.24,-515.75) 1611.56,-515.75 1620.44,-506.87 U2.3 ; U3.3 1766.35,-711.61 v1(1766.35,-773.53) ; v1(1767.53,-980.44) U4.2
  Bottom Layer w7.8: P2.4 1126.82,-491.14 1219.88,-398.08 1573.08,-398.08 1610.24,-435.24 v1(1610.24,-515.75) 1766.35,-671.87 v1(1766.35,-773.53) 1766.35,-793.65 1725,-835 1725,-937.91 v1(1767.53,-980.44)
OUT0: R18.1 U5.2 | length 136.1
  Top Layer w7.8: R18.1 1102.36,-1125.98 1124.09,-1104.25 U5.2
OUT1: R19.1 U5.7 | length 123.7
  Top Layer w7.8: U5.7 1500.92,-1104.25 R19.1
P0: SW1.A1 SW1.A2 U1.1 | length 462.6
  Top Layer w7.8: SW1.A2 SW1.A1 1118.28,-629.69 1140.71,-652.13 U1.1
P1: SW2.A1 SW2.A2 U1.2 | length 648.5
  Top Layer w7.8: SW2.A1 SW2.A2 940.94,-527.73 940.94,-625.98 992.68,-677.72 U1.2
P2: R12.1 U1.3 | length 254.7
  Top Layer w7.8: U1.3 1253.31,-703.31 1275,-725 1275,-760 1321.22,-806.22 R12.1
P3: R13.1 U1.5 | length 848.9
  Top Layer w7.8: R13.1 1093.69,-733.82 1109.47,-749.6 1124.6,-749.6 1340,-965 1475,-965 1520,-920 1520,-800 1475,-755 1425,-755 1399.26,-729.26 1363.55,-729.26 U1.5
SCL: P1.4 R9.1 U9.19 | length 1198.3
  Top Layer w7.8: P1.4 105.75,-1222.53 R9.1 238.7,-1222.53 261.18,-1200.04 633.11,-1200.04 803.15,-1370.08 803.15,-1590.55 868.89,-1656.29 U9.19
SDA: P1.3 R8.1 U9.20 | length 1208.1
  Top Layer w7.8: P1.3 83.11,-1286.99 102.38,-1267.72 133.86,-1267.72 R8.1 230.95,-1267.72 274.25,-1224.42 625.99,-1224.42 779.53,-1377.95 779.53,-1602.4 865.41,-1688.28 U9.20
SMBCK: P2.3 R1.1 R4.1 R6.1 R10.1 R14.2 R16.1 R21.1 R24.1 R29.1 | length 4018
  Top Layer w7.8: P2.3 146.26,-591.14 168.38,-613.26 v1(209.13,-613.26) ; v1@209.15,-613.24 R4.1 ; v1(292.76,-1112.44) 292.84,-1112.52 R24.1 ; v1(1303.08,-1523.54) 1303.15,-1523.62 R21.1 ; v1(1329.41,-1736.14) 1329.48,-1736.22 R29.1 ; R1.1@1486.03,-730.69 1510.27,-730.69 1546.85,-694.11 v1(1562.06,-694.11) ; v1@1535.25,-481.3 R6.1@1560.49,-481.3 ; R16.1 v1(1570.06,-1198.19) ; v1(1562.06,-694.11) R10.1@1587.33,-694.08 ; v1(1624.89,-931.42) 1624.96,-931.5 R14.2
  Bottom Layer w7.8: v1(292.76,-1112.44) 265.16,-1084.84 265.16,-810.16 180,-725 180,-642.39 v1(209.13,-613.26) 267.39,-555 1345,-555 1440.16,-459.84 1513.73,-459.84 v1(1535.22,-481.33) 1535.22,-667.26 v1(1562.06,-694.11) 1624.89,-756.93 v1(1624.89,-931.42) 1624.89,-1180.11 1606.81,-1198.19 v1(1570.06,-1198.19) 1386.81,-1198.19 1285,-1300 1285,-1505.47 v1(1303.08,-1523.54) 1329.41,-1549.87 v1(1329.41,-1736.14)
SMBDA: P2.2 R3.1 R5.1 R7.1 R11.1 R15.2 R17.1 R23.1 R25.1 R30.1 | length 4015.1
  Top Layer w7.8: P2.2 202.75,-691.14 205.83,-688.06 v1(209.13,-688.06) ; v1@209.15,-688.04 R3.1 R3.1@240.01,-691.14 ; v1(292.76,-1077.01) 292.84,-1077.09 R25.1 ; v1(1303.08,-1558.98) 1303.15,-1559.05 R23.1 ; v1(1351.31,-1771.58) 1351.38,-1771.65 R30.1 ; R5.1@1486.03,-691.32 v1@1511.27,-691.32 ; v1(1499.06,-481.74) 1499.06,-480.94 1533.56,-446.44 R7.1@1560.49,-446.44 ; v1@1511.3,-691.29 v1(1515.92,-691.29) 1520.54,-691.29 1561.03,-650.8 ; R17.1@1544.33,-1161.39 1600.46,-1161.39 v1(1600.7,-1161.15) ; 1561.11,-650.77 R11.1@1586.35,-650.77 ; v1(1602.99,-900) R15.2
  Bottom Layer w7.8: v1(292.76,-1077.01) 292.76,-802.76 209.13,-719.13 v1(209.13,-688.06) 322.19,-575 1350,-575 1443.26,-481.74 v1(1499.06,-481.74) 1515.92,-498.61 1515.92,-694.59 1521.15,-699.82 1521.15,-701.15 1605,-785 1605,-897.99 v1(1602.99,-900) 1602.99,-1158.86 v1(1600.7,-1161.15) 1388.85,-1161.15 1265,-1285 1265,-1520.9 v1(1303.08,-1558.98) 1303.08,-1758.08 1316.77,-1771.77 1323.23,-1771.77 1323.42,-1771.58 v1(1351.31,-1771.58)
pads on no net: U7.2 U7.3 U7.4 U7.5 U7.6 U7.7 U7.12 U7.14 U7.15 U7.16 U7.17 U7.19 U7.21 U7.22 U7.25 U9.1 U9.7 U9.8 U9.10 U9.12 U9.13 U9.14 U9.15 U9.16 U9.21 U9.22 U9.23 U9.24 U9.26 U9.27 U10.4 U10.9 U10.10 U10.11
copper on no net:
  other v2: 1475.71,-1519.53 1519.02,-1519.53 1475.71,-1476.22 1519.02,-1476.22

## Polygon pours and split planes (outlines as drawn)
5V on Top Layer "5V_L01_P001" (solid, pour order 1): 461.42,-1381.87 465.36,-1385.81 465.36,-1511.8 457.48,-1519.67 453.55,-1523.61 355.12,-1523.61 343.31,-1511.8 343.31,-1389.75 351.19,-1381.87
5V_M on Top Layer "5V_M_L01_P002" (solid, pour order 2): 559.85,-1795.26 555.91,-1799.2 520.48,-1799.2 512.6,-1791.32 512.6,-1511.8 496.85,-1496.05 496.85,-1389.75 504.73,-1381.87 563.78,-1381.87 571.66,-1389.75 571.66,-1499.98 559.85,-1511.8
GND on Top Layer "GND_L01_P004" (solid, pour order 4): 807.09,-610.24 807.09,-771.65 811.02,-775.59 909.45,-775.59 913.39,-771.65 913.39,-610.24 909.45,-606.3 811.02,-606.3
3V3_SYS on Top Layer "3V3_SYS_L01_P003" (solid, pour order 3): 645.67,-657.48 696.85,-606.3 795.28,-606.3 799.21,-610.24 799.21,-771.65 795.28,-775.59 531.5,-775.59 480.31,-724.41 275.59,-724.41 267.72,-716.54 267.72,-503.94 279.53,-492.13 358.27,-492.13 370.08,-503.94 370.08,-649.61 377.95,-657.48
5V on Top Layer "5V_L01_P000" (solid, pour order 0): 23.62,-744.09 23.62,-850.39 31.5,-858.27 137.8,-858.27 185.04,-811.02 468.5,-811.02 476.38,-803.15 476.38,-744.09 468.5,-736.22 31.5,-736.22 27.56,-740.16
GND on Layer 2 "GND_L02_P006" (solid, pour order 6): 1.97,-1969.61 1970.47,-1969.61 1970.47,-1.1 1.97,-1.1
5V on Bottom Layer "5V_L04_P007" (solid, pour order 7): 35,-750 35,-1575 55,-1595 430,-1595 450,-1575 450,-1240 355,-1145 255,-1145 235,-1125 235,-800 170,-735 50,-735
3V3_SYS on Layer 3 "3V3_SYS_L03_P008" (solid, pour order 8): 1.97,-1969.61 1970.47,-1969.61 1970.47,-1.1 1.97,-1.1

## Keep-outs
Keep-Out Layer:
  lines w40: 0,-1968.5 1968.5,-1968.5 1968.5,0 0,0 0,-1968.5

## Silkscreen, mask and mechanical layers (free items; w line width, h text height)
Mechanical 1:
  the board outline again, w5